# Altium PCB 400390.PcbDoc (part 3 of 5)
Units mm, origin at the board's own origin, x right, y up, seen from the top; angles counter-clockwise.
Board outline 50.8 x 50.4 mm, 4 copper layers (Top Layer, Mid Layer 1, Mid Layer 2, Bottom Layer), stack 1.507 mm thick; 262 components, 210 nets, 1216 pads, 1075 vias.
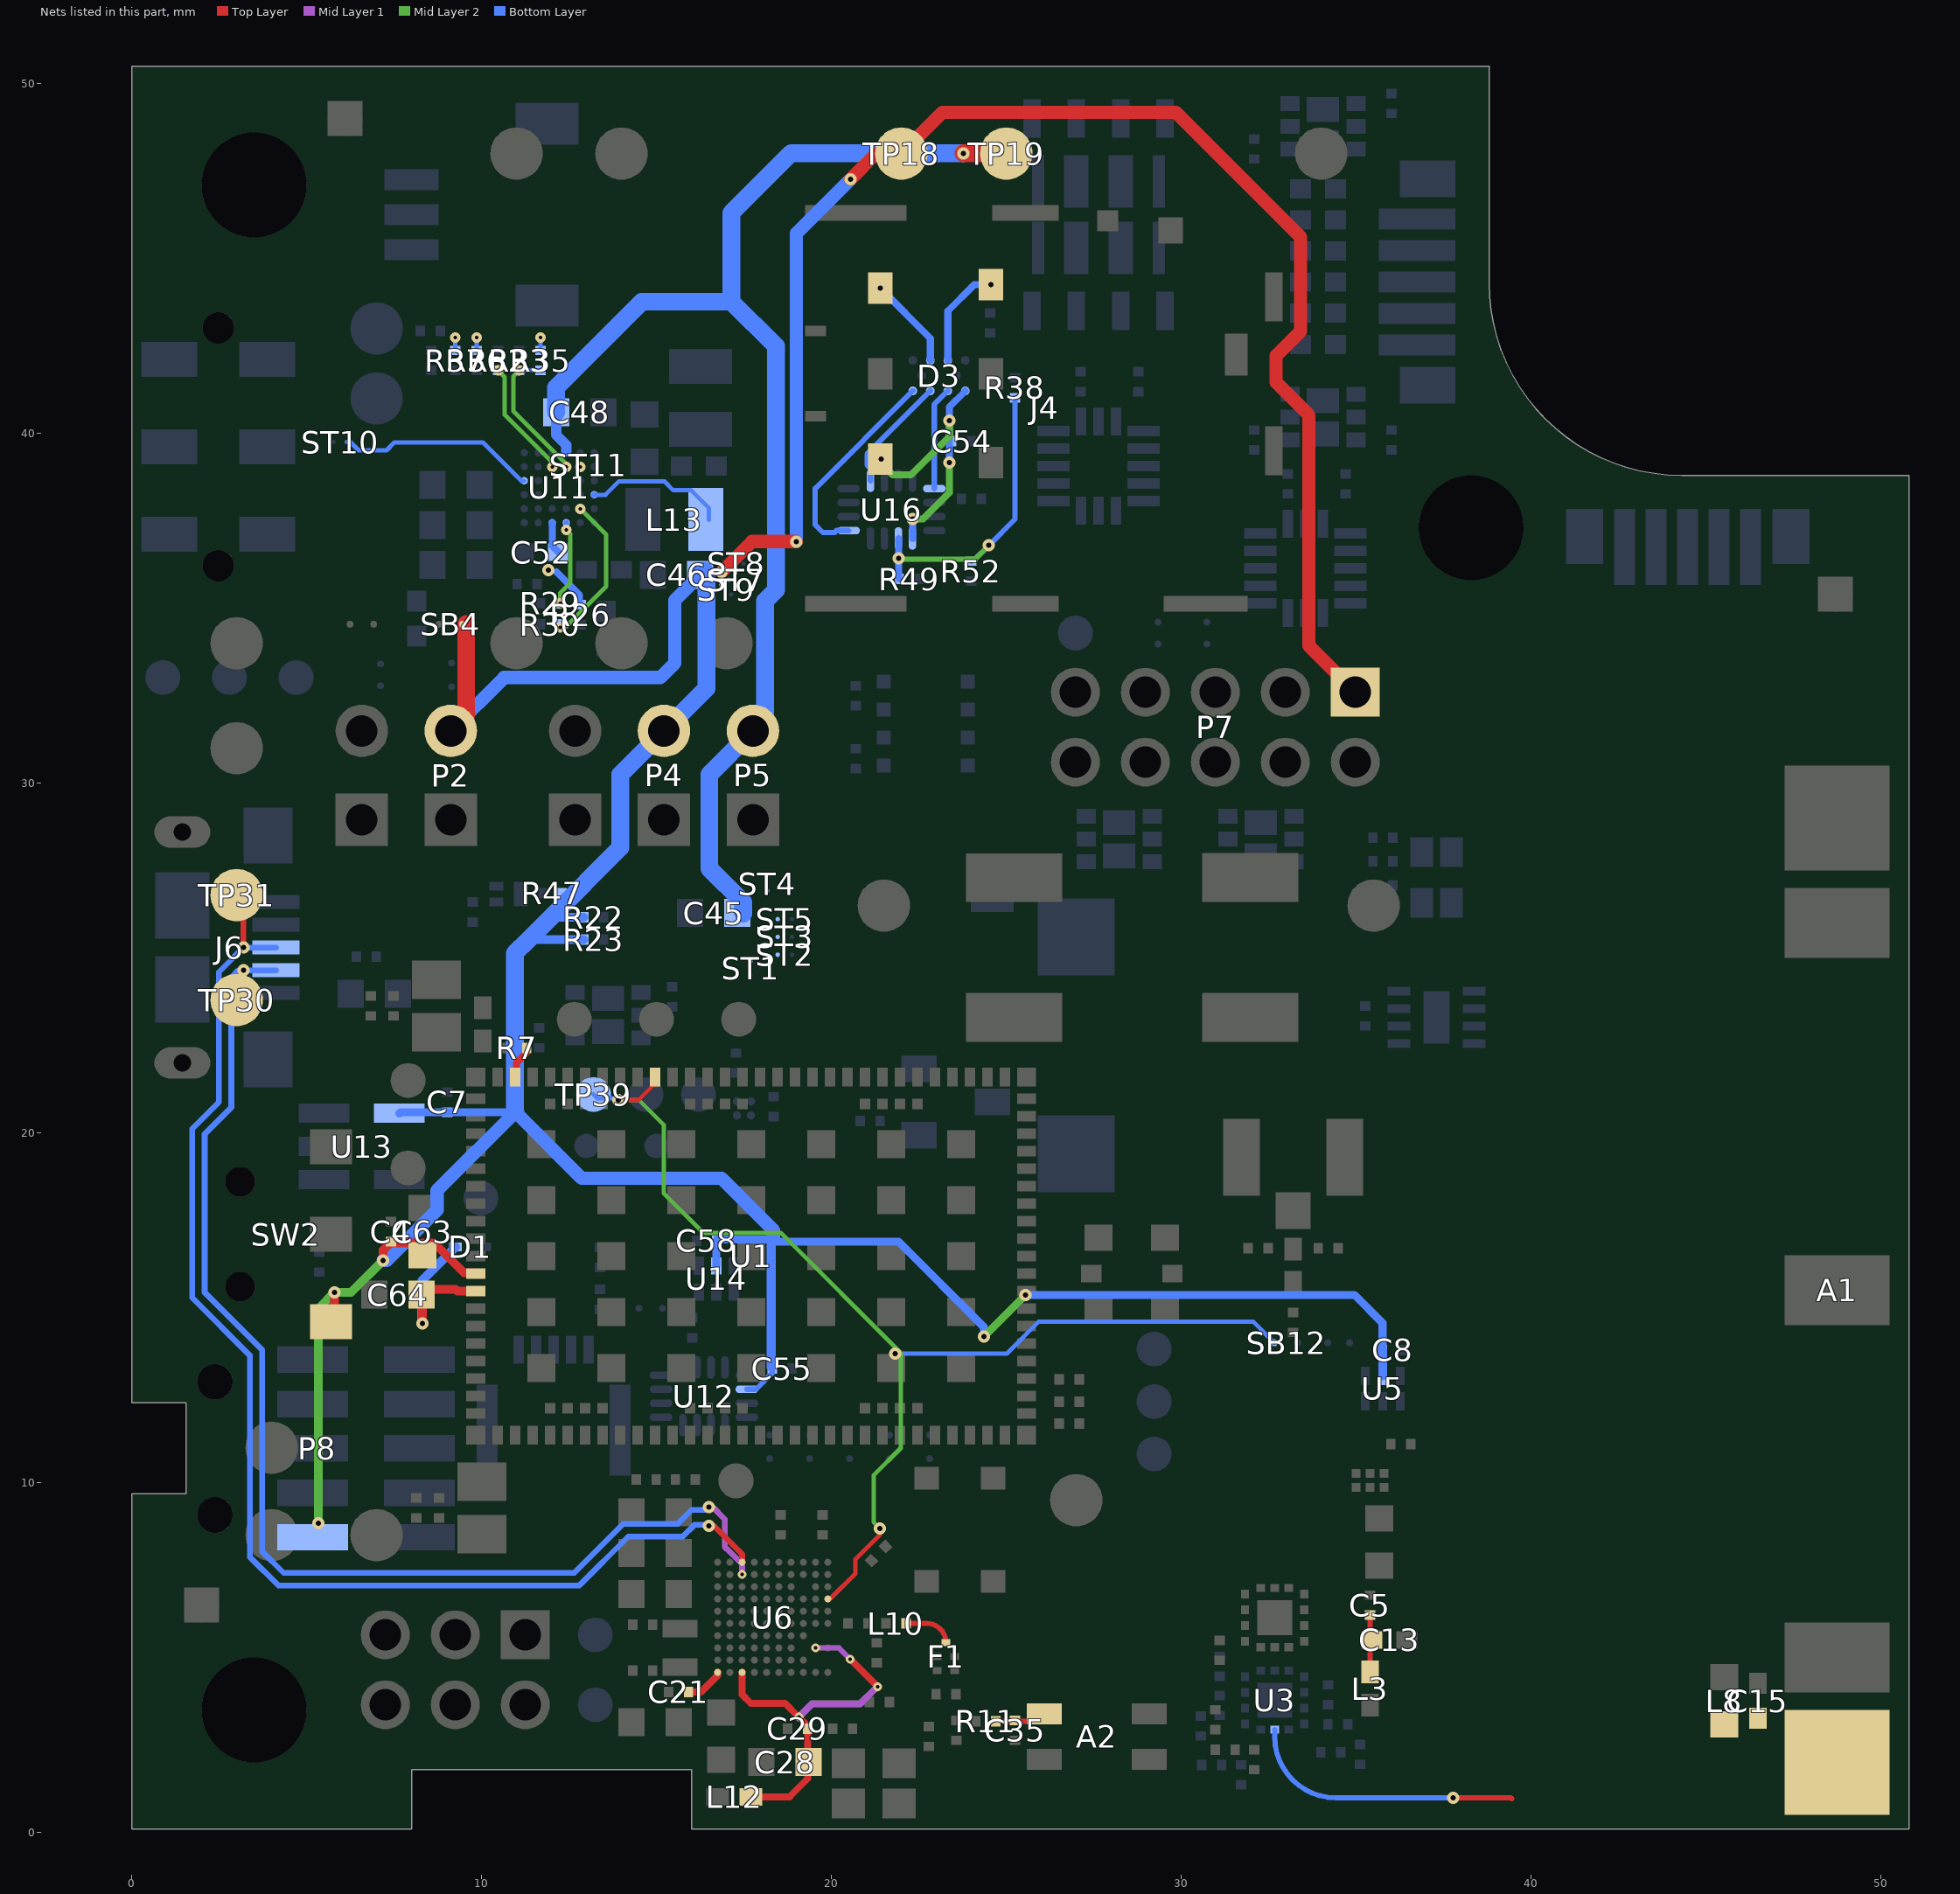
[diagram p4: the nets of this part, all layers, seen from the top]

## Part data (continued)
R13 R14: library part R0201-39R, "Resistor, ±1%, 0.05W", Manufacturer=N.A., Part number IPS=00000001704, Artikkelnr Noca=N.A., Component Class=Resistors, ComponentLink1Description=Datasheet, ComponentLink1URL=N.A., ComponentLink2Description="Supplier link", ComponentLink2URL=N.A., Footprint Doc=0201, HelpURL=N.A., LatestRevisionDate=2014-11-13, Manufacturer Part Number=N.A., Note="Chip Res 1%", Pad Count=2, Part Number=R0201-39R, PartId=100100021, Published=2014-11-13, Supplier 1=N.A., Supplier 2=N.A., Supplier Part Number 1=N.A., Supplier Part Number 2=N.A.
R15 R18: library part R0402-169, "Resistor, ±1%, 0.063W", Manufacturer=N.A., Part number IPS=00000007805, Supplier Part Number 1=541-169LCT-ND, Artikkelnr Noca=N.A., Component Class=Resistors, ComponentLink1Description=Datasheet, ComponentLink1URL=N.A., ComponentLink2Description="Supplier link", ComponentLink2URL=N.A., Footprint Doc=0402, HelpURL=N.A., LatestRevisionDate=2016-09-22, Manufacturer Part Number=N.A., Note="Chip Res 1%", Pad Count=2, Part Number=R0402-169, PartId=100100153, Published=2016-09-22, Supplier 1=Digi-Key, Supplier 2=N.A., Supplier Part Number 2=N.A.
R16 R19: library part R0402-7R15, "Resistor, ±1%, 0.063W", Manufacturer=N.A., Part number IPS=00000007806, Supplier Part Number 1=541-7.15LLCT-ND, Artikkelnr Noca=N.A., Component Class=Resistors, ComponentLink1Description=Datasheet, ComponentLink1URL=N.A., ComponentLink2Description="Supplier link", ComponentLink2URL=N.A., Footprint Doc=0402, HelpURL=N.A., LatestRevisionDate=2016-09-22, Manufacturer Part Number=N.A., Note="Chip Res 1%", Pad Count=2, Part Number=R0402-7R15, PartId=100100123, Published=2016-09-22, Supplier 1=Digi-Key, Supplier 2=N.A., Supplier Part Number 2=N.A.
R17 R20: library part R0402-11R, "Resistor, ±1%, 0.063W", Manufacturer=N.A., Part number IPS=00000007807, Supplier Part Number 1=214-0577, Artikkelnr Noca=N.A., Component Class=Resistors, ComponentLink1Description=Datasheet, ComponentLink1URL=N.A., ComponentLink2Description="Supplier link", ComponentLink2URL=N.A., Footprint Doc=0402, HelpURL=N.A., LatestRevisionDate=2016-11-09, Manufacturer Part Number=N.A., Note="Chip Res 1%", Pad Count=2, Part Number=R0402-11R, PartId=100100127, Published=2016-11-09, Supplier 1=Farnell, Supplier 2=N.A., Supplier Part Number 2=N.A.
R22 R23: library part R0201-4k7, "Resistor, ±1%, 0.05W", Manufacturer=N.A., Part number IPS=00000001706, Artikkelnr Noca=N.A., Component Class=Resistors, ComponentLink1Description=Datasheet, ComponentLink1URL=N.A., ComponentLink2Description="Supplier link", ComponentLink2URL=N.A., Footprint Doc=0201, HelpURL=N.A., LatestRevisionDate=2014-11-13, Manufacturer Part Number=N.A., Note="Chip Res 1%", Pad Count=2, Part Number=R0201-4k7, PartId=100100061, Published=2014-11-13, Supplier 1=N.A., Supplier 2=N.A., Supplier Part Number 1=N.A., Supplier Part Number 2=N.A.
R24: library part R0402-0R1, "Resistor, ±1%, 0.063W", Manufacturer=N.A., Part number IPS=00000001795, Supplier Part Number 1=311-.10PDKR-ND, Artikkelnr Noca=N.A., Component Class=Resistors, ComponentLink1Description=Datasheet, ComponentLink1URL=N.A., ComponentLink2Description="Supplier link", ComponentLink2URL=N.A., Footprint Doc=0402, HelpURL=N.A., LatestRevisionDate=2012-06-22, Manufacturer Part Number=N.A., Note="Chip Res 1%", Pad Count=2, Part Number=R0402-0R1, PartId=100100111, Published=2012-06-22, Supplier 1=Digi-Key, Supplier 2=N.A., Supplier Part Number 2=N.A.
R25 R31: library part R0402-2R2, "Resistor, ±1%, 0.063W", Manufacturer=N.A., Part number IPS=00000001796, Artikkelnr Noca=27049009, Component Class=Resistors, ComponentLink1Description=Datasheet, ComponentLink1URL=N.A., ComponentLink2Description="Supplier link", ComponentLink2URL=N.A., Footprint Doc=0402, HelpURL=N.A., LatestRevisionDate=2012-06-22, Manufacturer Part Number=N.A., Note="Chip Res 1%", Pad Count=2, Part Number=R0402-2R2, PartId=100100116, Published=2012-06-22, Supplier 1=N.A., Supplier 2=N.A., Supplier Part Number 1=N.A., Supplier Part Number 2=N.A.
R26 R29 R33 R51 R52: library part R0201-N.C., "Not mounted", Manufacturer=N.A., Artikkelnr Noca=N.A., Assembly="Not mounted", Component Class=Resistors, ComponentLink1Description=Datasheet, ComponentLink1URL=N.A., ComponentLink2Description="Supplier link", ComponentLink2URL=N.A., Footprint Doc=0201, HelpURL=N.A., LatestRevisionDate=2014-11-13, Manufacturer Part Number=N.A., Note="Chip Res", Pad Count=2, Part Number=R0201-N.C., Part number IPS=N.A., PartId=100100107, Published=2014-11-13, Supplier 1=N.A., Supplier 2=N.A., Supplier Part Number 1=N.A., Supplier Part Number 2=N.A.
R39 R40 R50: library part R0201-100k, "Resistor, ±1%, 0.05W", Manufacturer=N.A., Part number IPS=00000001419, Artikkelnr Noca=N.A., Component Class=Resistors, ComponentLink1Description=Datasheet, ComponentLink1URL=N.A., ComponentLink2Description="Supplier link", ComponentLink2URL=N.A., Footprint Doc=0201, HelpURL=N.A., LatestRevisionDate=2014-11-13, Manufacturer Part Number=N.A., Note="Chip Res 1%", Pad Count=2, Part Number=R0201-100k, PartId=100100080, Published=2014-11-13, Supplier 1=N.A., Supplier 2=N.A., Supplier Part Number 1=N.A., Supplier Part Number 2=N.A.
R48: library part R0201-10M, "Resistor, ±1%, 0.05W", Manufacturer=N.A., Part number IPS=00000001426, Artikkelnr Noca=N.A., Component Class=Resistors, ComponentLink1Description=Datasheet, ComponentLink1URL=N.A., ComponentLink2Description="Supplier link", ComponentLink2URL=N.A., Footprint Doc=0201, HelpURL=N.A., LatestRevisionDate=2014-11-13, Manufacturer Part Number=N.A., Note="Chip Res 1%", Pad Count=2, Part Number=R0201-10M, PartId=100100105, Published=2014-11-13, Supplier 1=N.A., Supplier 2=N.A., Supplier Part Number 1=N.A., Supplier Part Number 2=N.A.
SB1 SB3 SB4 SB7 SB8 SB9 SB10 SB11 SB12 SB14: library part "Solderbridge Shorted", "Shorted Solderbridge", Manufacturer=N.A., Artikkelnr Noca=N.A., Component Class=Connectors, ComponentLink1Description=Datasheet, ComponentLink1URL=N.A., ComponentLink2Description="Supplier link", ComponentLink2URL=N.A., Footprint Doc=Solderbridge_Shorted, HelpURL=N.A., LatestRevisionDate=2012-08-07, Manufacturer Part Number=N.A., Note=N.A., Pad Count=2, Part Number="Solderbridge Shorted", Part number IPS=N.A., PartId=100500459, Published=2012-08-07, Supplier 1=N.A., Supplier 2=N.A., Supplier Part Number 1=N.A., Supplier Part Number 2=N.A.
SB2 SB5 SB6 SB13: Manufacturer=N.A., Artikkelnr Noca=N.A., Component Class=Connectors, ComponentLink1Description=Datasheet, ComponentLink1URL=N.A., ComponentLink2Description="Supplier link", ComponentLink2URL=N.A., Footprint Doc=Solderbridge, HelpURL=N.A., LatestRevisionDate=2009-12-14, Manufacturer Part Number=N.A., Note=N.A., Pad Count=2, Part Number=Solderbridge, Part number IPS=N.A., PartId=100500458, Published=2009-12-14, Supplier 1=N.A., Supplier 2=N.A., Supplier Part Number 1=N.A., Supplier Part Number 2=N.A.
ST1 ST2 ST3 ST4 ST5 ST7 ST8 ST9 ST10 ST11: library part "2 pin starpoint", "Starpoint", Artikkelnr Noca=N.A., Component Class=Connectors, ComponentLink1Description=Datasheet, ComponentLink1URL=N.A., ComponentLink2Description="Supplier link", ComponentLink2URL=N.A., Footprint Doc=N.A., HelpURL=N.A., LatestRevisionDate=2017-08-31, Manufacturer=N.A., Manufacturer Part Number=N.A., Note=N.A., Pad Count=2, Part Number="2 pin starpoint", Part number IPS=N.A., PartId=100500603, Published=2017-08-31, Supplier 1=N.A., Supplier 2=N.A., Supplier Part Number 1=N.A., Supplier Part Number 2=N.A.
SW1: library part Switch-Slide-RA-J-Lead-DPDT-8.5x3.5mm_Copal, "SMD slide Switch (ON-ON)", Manufacturer="Copal Electronics Inc", Manufacturer Part Number=CL-SB-22A-11T, Part number IPS=00000007811, Supplier Part Number 1=563-1340-1-ND, Artikkelnr Noca=N.A., Component Class=Switches, ComponentLink1Description=Datasheet, ComponentLink1URL=N.A., ComponentLink2Description="Supplier link", ComponentLink2URL=N.A., Footprint Doc=Switch-Slide-RA-J-Lead-DPDT-8.5x3.5mm, HelpURL=http://www.nidec-copal-electronics.com/e/catalog/switch/cl-sb.pdf, LatestRevisionDate=2017-02-01, Note=N.A., Pad Count=6, Part Number=Switch-Slide-RA-J-Lead-DPDT-8.5x3.5mm_Copal, PartId=101500038, Published=2017-02-01, Supplier 1=Digi-Key, Supplier 2=Avnet, Supplier Part Number 2=CL-SB-22A-11T
SW2: "Miniature slide switch, SPDT, Right-Angle, ON-ON, 12V, 100mA", Manufacturer=C&K, Part number IPS=00000002488, Supplier Part Number 1=401-2012-1-ND, Artikkelnr Noca=N.A., Component Class=Switches, ComponentLink1Description=Datasheet, ComponentLink1URL=https://www.ckswitches.com/media/1431/ayz.pdf, ComponentLink2Description="Supplier link", ComponentLink2URL=N.A., Footprint Doc=AYZ0102AGRLC, HelpURL=https://www.ckswitches.com/media/1431/ayz.pdf, LatestRevisionDate=2019-05-08, Manufacturer Part Number=AYZ0102AGRLC, Note=N.A., Pad Count=3, Part Number=AYZ0102AGRLC, PartId=101500120, Published=2019-05-08, Supplier 1=Digi-Key, Supplier 2=N.A., Supplier Part Number 2=N.A.
SW3: library part Switch-PB-6.2x6.3mm-SMD, "Tactile Switch, SPNO, SMD, 160gf, 6.2x6.3x2.5mm", Manufacturer=Dailywell, Manufacturer Part Number=TS604VM1-025BR-R, Part number IPS=00000007812, Artikkelnr Noca=50019106, Component Class=Switches, ComponentLink1Description=Datasheet, ComponentLink1URL=N.A., ComponentLink2Description="Supplier link", ComponentLink2URL=N.A., Footprint Doc=Switch-PB-6.2x6.3mm-SMD, HelpURL=\\hizz\pro\app9717\Datasheet\switches\Dailywell\TS604VM1-025BR-R.pdf, LatestRevisionDate=2016-04-21, Note=N.A., Pad Count=4, Part Number=Switch-PB-6.2x6.3mm-SMD, PartId=101500001, Published=2010-02-01, Supplier 1=Cabcon, Supplier 2=Mouser, Supplier Part Number 1=TS604VM1-025BR-R, Supplier Part Number 2=688-SKHUALE010
SW4: library part "KMT021 NGJ LHS", "Nano-Miniature Top Actuated Tact Switch with extended life 3.0x2.6mm", Manufacturer=C&K, Part number IPS=00000005416, Supplier Part Number 1=CKN10289CT-ND, Artikkelnr Noca=N.A., Component Class=Switches, ComponentLink1Description=Datasheet, ComponentLink1URL=N.A., ComponentLink2Description="Supplier link", ComponentLink2URL=N.A., Footprint Doc=SW_TACTILE_2.6x3.0MM_4-LEAD, HelpURL=http://media.digikey.com/pdf/Data%20Sheets/C&K/KMT_0xx_NGJ_LHS_Drawing.pdf, LatestRevisionDate=2013-08-12, Manufacturer Part Number="KMT021 NGJ LHS", Note=N.A., Pad Count=4, Part Number="KMT021 NGJ LHS", PartId=101500039, Published=2013-08-12, Supplier 1=Digi-Key, Supplier 2=Farnell, Supplier Part Number 2=190-8260
TP1 TP2 TP3 TP4 TP7 TP8 TP22 TP23 TP24 TP25 TP26 TP34 TP35 TP36 TP37 TP38 TP39 TP40 TP41: library part TP_SMD_Ø1.0MM, "1.0mm circular SMD testpad", Manufacturer="Nordic Semiconductor", Manufacturer Part Number=N.A., Artikkelnr Noca=N.A., Component Class=Connectors, ComponentLink1Description=Datasheet, ComponentLink1URL=N.A., ComponentLink2Description="Supplier link", ComponentLink2URL=N.A., Footprint Doc=TP_SMD_Ø1.0mm, HelpURL=N.A., LatestRevisionDate=2013-06-11, Note=N.A., Pad Count=1, Part Number=TP_SMD_Ø1.0MM, Part number IPS=N.A., PartId=100500475, Published=2013-06-11, Supplier 1=N.A., Supplier 2=N.A., Supplier Part Number 1=N.A., Supplier Part Number 2=N.A.
TP5 TP6: library part TP_SMD_Ø0.7MM, "0.7mm circular SMD testpad", Manufacturer="Nordic Semiconductor", Manufacturer Part Number=N.A., Artikkelnr Noca=N.A., Component Class=Connectors, ComponentLink1Description=Datasheet, ComponentLink1URL=N.A., ComponentLink2Description="Supplier link", ComponentLink2URL=N.A., Footprint Doc=TP_SMD_Ø0.7mm, HelpURL=N.A., LatestRevisionDate=2017-12-14, Note=N.A., Pad Count=1, Part Number=TP_SMD_Ø0.7MM, Part number IPS=N.A., PartId=100500474, Published=2017-12-14, Supplier 1=N.A., Supplier 2=N.A., Supplier Part Number 1=N.A., Supplier Part Number 2=N.A.
TP9 TP10 TP11 TP12 TP13 TP14 TP15 TP16 TP17 TP18 TP19 TP20 TP21 TP27 TP28 TP29 TP30 TP31 TP32 TP33: library part TP_SMD_Ø1.5MM, "1.5mm circular SMD testpad", Manufacturer="Nordic Semiconductor", Manufacturer Part Number=N.A., Artikkelnr Noca=N.A., Component Class=Connectors, ComponentLink1Description=Datasheet, ComponentLink1URL=N.A., ComponentLink2Description="Supplier link", ComponentLink2URL=N.A., Footprint Doc=TP_SMD_Ø1.5mm, HelpURL=N.A., LatestRevisionDate=2016-06-02, Note=N.A., Pad Count=1, Part Number=TP_SMD_Ø1.5MM, Part number IPS=N.A., PartId=100500477, Published=2016-06-02, Supplier 1=N.A., Supplier 2=N.A., Supplier Part Number 1=N.A., Supplier Part Number 2=N.A.
U1: "Low power System-in-Package with integrated LTE-M/NB-IoT modem and GPS", Manufacturer="Nordic Semiconductor", Part number IPS=80000002329, Artikkelnr Noca=N.A., Component Class=nRF_Devices, ComponentLink1Description=Datasheet, ComponentLink1URL=N.A., ComponentLink2Description="Supplier link", ComponentLink2URL=N.A., Footprint Doc=LGA-161, HelpURL=N.A., LatestRevisionDate=2020-08-13, Manufacturer Part Number=nRF9160-SICAB1A, Note=N.A., Pad Count=161, Part Number=nRF9160-SICAB1A, PartId=102000165, Published=2020-08-13, Supplier 1="Nordic Semiconductor", Supplier 2=N.A., Supplier Part Number 1=nRF9160-SICAB1A, Supplier Part Number 2=N.A.
U2 U3: "SP8T Switch For 3G/4G Applications", Manufacturer=Qorvo, Part number IPS=80000001821, Supplier Part Number 1=N.A., Artikkelnr Noca=N.A., Component Class=Misc_ICs, ComponentLink1Description=Datasheet, ComponentLink1URL="\\hizz\pro\app9717\Datasheet\integated circuits\qorvo\QM12038 Datasheet.pdf", ComponentLink2Description="Supplier link", ComponentLink2URL=N.A., Footprint Doc=UFQFN-14, HelpURL=N.A., LatestRevisionDate=2018-09-18, Manufacturer Part Number=QM12038, Note=N.A., Pad Count=14, Part Number=QM12038, PartId=101900557, Published=2018-09-18, Supplier 1=N.A., Supplier 2=N.A., Supplier Part Number 2=N.A.
U4: library part BGA524N6E6327XTSA1, "GPS/GNSS Low-Noise Amplifier, 19.6dB Gain, 0.55dB Noise Figure, 1.5V to 3.3V Supply Range", Manufacturer="Infineon Technologies", Part number IPS=00000004011, Supplier Part Number 1=BGA524N6E6327XTSA1CT-ND, Artikkelnr Noca=N.A., Component Class=Misc_ICs, ComponentLink1Description=Datasheet, ComponentLink1URL=https://www.infineon.com/dgdl/Infineon-BGA524N6-DS-v03_00-en.pdf?fileId=db3a304344e406b50144e44dfad302b9, ComponentLink2Description="Supplier link", ComponentLink2URL=N.A., Footprint Doc=XFDFN-6, HelpURL=https://www.infineon.com/cms/en/product/rf-wireless-control/low-noise-amplifier-lna-ics/gps-glonass-compass-lna/bga524n6/, LatestRevisionDate=2019-10-25, Manufacturer Part Number=BGA524N6E6327XTSA1, Note=N.A., Pad Count=6, Part Number=BGA524N6E6327XTSA1, PartId=101900596, Published=2019-10-25, Supplier 1=Digi-Key, Supplier 2=Mouser, Supplier Part Number 2=726-A524N6E6327XTSA1
U5: "Single 3-input AND gate", Manufacturer="ON Semiconductor", Part number IPS=00000001709, Supplier Part Number 1=NC7SV11L6XCT-ND, Artikkelnr Noca=N.A., Component Class=Misc_ICs, ComponentLink1Description=Datasheet, ComponentLink1URL=https://www.fairchildsemi.com/datasheets/NC/NC7SV11.pdf, ComponentLink2Description="Supplier link", ComponentLink2URL=N.A., Footprint Doc=UFDFN-6, HelpURL=https://www.fairchildsemi.com/datasheets/NC/NC7SV11.pdf, LatestRevisionDate=2018-09-27, Manufacturer Part Number=NC7SV11L6X, Note="Single 3-input AND gate", Pad Count=6, Part Number=NC7SV11L6X, PartId=101900559, Published=2018-09-27, Supplier 1=Digi-Key, Supplier 2=Mouser, Supplier Part Number 2=512-NC7SV11L6X
U6: library part nRF52840-CKAAD0, "Multi-protocol Bluetooth Low Energy, IEEE 802.15.4, ANT and 2.4GHz proprietary system-on-chip", Manufacturer="Nordic Semiconductor", Part number IPS=80000001822, Artikkelnr Noca=N.A., Component Class=nRF_Devices, ComponentLink1Description=Datasheet, ComponentLink1URL=N.A., ComponentLink2Description="Supplier link", ComponentLink2URL=N.A., Footprint Doc=WLCSP-94, HelpURL=N.A., LatestRevisionDate=2018-12-17, Manufacturer Part Number=nRF52840-CKAAD0, Note=N.A., Pad Count=94, Part Number=nRF52840-CKAAD0, PartId=102000136, Published=2018-12-17, Supplier 1="Nordic Semiconductor", Supplier 2=N.A., Supplier Part Number 1=nRF52840-CKAAD0, Supplier Part Number 2=N.A.
U7: "Micropower, 3-Axis, ±200g digital output acelerometer", Manufacturer="Analog Devices", Part number IPS=00000001798, Supplier Part Number 1=ADXL372BCCZ-RL7CT-ND, Artikkelnr Noca=N.A., Component Class=Misc_ICs, ComponentLink1Description=Datasheet, ComponentLink1URL=http://www.analog.com/media/en/technical-documentation/data-sheets/ADXL372.pdf, ComponentLink2Description="Supplier link", ComponentLink2URL=http://www.analog.com/en/products/adxl372.html, Footprint Doc=LGA-16, HelpURL=http://www.analog.com/en/products/adxl372.html, LatestRevisionDate=2018-08-24, Manufacturer Part Number=ADXL372, Note=N.A., Pad Count=16, Part Number=ADXL372, PartId=101900553, Published=2018-08-24, Supplier 1=Digi-Key, Supplier 2=N.A., Supplier Part Number 2=N.A.
U8: "Micropower, 3-Axis, ±2 g/±4 g/±8 g Digital Output MEMS Accelerometer", Manufacturer="Analog Devices", Part number IPS=00000001799, Supplier Part Number 1=ADXL362BCCZ-RL7CT-ND, Artikkelnr Noca=N.A., Component Class=Misc_ICs, ComponentLink1Description=Datasheet, ComponentLink1URL=http://www.analog.com/media/en/technical-documentation/data-sheets/ADXL362.pdf, ComponentLink2Description="Supplier link", ComponentLink2URL=http://www.analog.com/en/products/adxl362.html, Footprint Doc=LGA-16, HelpURL=https://www.analog.com/media/en/technical-documentation/data-sheets/ADXL362.pdf, LatestRevisionDate=2019-01-11, Manufacturer Part Number=ADXL362, Note=N.A., Pad Count=16, Part Number=ADXL362, PartId=101900573, Published=2019-01-11, Supplier 1=Digi-Key, Supplier 2=Mouser, Supplier Part Number 2=584-ADXL362BCCZ-R7
U9: "Low power gas, pressure, temperature & humidity sensor", Manufacturer=Bosch, Part number IPS=00000001800, Supplier Part Number 1=828-1077-1-ND, Artikkelnr Noca=N.A., Component Class=Misc_ICs, ComponentLink1Description=Datasheet, ComponentLink1URL=https://ae-bst.resource.bosch.com/media/_tech/media/datasheets/BST-BME680-DS001-00.pdf, ComponentLink2Description="Supplier link", ComponentLink2URL=N.A., Footprint Doc=LGA-8, HelpURL=N.A., LatestRevisionDate=2018-05-24, Manufacturer Part Number=BME680, Note=N.A., Pad Count=8, Part Number=BME680, PartId=101900532, Published=2018-05-24, Supplier 1=Digi-Key, Supplier 2=N.A., Supplier Part Number 2=N.A.
U10: "Digital 16bit Serial Output Type Color Sensor IC", Manufacturer="Rohm Semiconductor", Part number IPS=00000001801, Supplier Part Number 1=BH1749NUC-E2CT-ND, Artikkelnr Noca=N.A., Component Class=Misc_ICs, ComponentLink1Description=Datasheet, ComponentLink1URL=N.A., ComponentLink2Description="Supplier link", ComponentLink2URL=N.A., Footprint Doc=WSON-8, HelpURL=https://www.rohm.com/datasheet/BH1749NUC/bh1749nuc-e, LatestRevisionDate=2019-01-11, Manufacturer Part Number=BH1749NUC, Note=N.A., Pad Count=8, Part Number=BH1749NUC, PartId=101900572, Published=2019-01-11, Supplier 1=Digi-Key, Supplier 2=Mouser, Supplier Part Number 2=755-BH1749NUC-E2
U11: "Advanced Battery Management PMIC With Ultralow Iq Buck and Buck-Boost", Manufacturer="Analog Devices", Part number IPS=80000001823, Supplier Part Number 1=N.A., Artikkelnr Noca=N.A., Component Class=Misc_ICs, ComponentLink1Description=Datasheet, ComponentLink1URL="\\hizz\pro\app9717\Datasheet\integated circuits\analog\ADP5360 PRC3 Datasheet_022017.pdf", ComponentLink2Description="Supplier link", ComponentLink2URL=N.A., Footprint Doc=WLCSP-32, HelpURL=N.A., LatestRevisionDate=2018-09-18, Manufacturer Part Number=ADP5360ACBZ, Note=N.A., Pad Count=32, Part Number=ADP5360ACBZ, PartId=101900554, Published=2018-09-18, Supplier 1=N.A., Supplier 2=N.A., Supplier Part Number 2=N.A.
U12: "Data / Audio Low-Voltage Dual DPDT Analog Switch", Manufacturer="ON Semiconductor", Part number IPS=00000009986, Supplier Part Number 1=FSA2466UMXCT-ND, Artikkelnr Noca=15070069, Component Class=Misc_ICs, ComponentLink1Description=Datasheet, ComponentLink1URL=N.A., ComponentLink2Description="Supplier link", ComponentLink2URL=N.A., Footprint Doc=UFQFN-16, HelpURL=https://www.onsemi.com/pub/Collateral/FSA2466-D.PDF, LatestRevisionDate=2019-05-15, Manufacturer Part Number=FSA2466UMX, Note=N.A., Pad Count=16, Part Number=FSA2466UMX, PartId=101900422, Published=2016-05-18, Supplier 1=Digi-Key, Supplier 2=Mouser, Supplier Part Number 2=512-FSA2466UMX
U13: library part 24CW160T-I/OT, "16 Kbit I2C Serial EEPROM with Software Write Protection, 1.6-5.5 V Supply", Manufacturer="Microchip Technology", Part number IPS=00000004049, Supplier Part Number 1=24CW160T-I/OTCT-ND, Artikkelnr Noca=N.A., Component Class=Misc_ICs, ComponentLink1Description=Datasheet, ComponentLink1URL=http://ww1.microchip.com/downloads/en/DeviceDoc/24CW16X-24CW32X-24CW64X-24CW128X-Data-Sheet-20005772B.pdf, ComponentLink2Description="Supplier link", ComponentLink2URL=https://www.digikey.com/product-detail/en/microchip-technology/24CW160T-I-OT/24CW160T-I-OTCT-ND/8594982, Footprint Doc=TSOT23-5, HelpURL=https://www.microchip.com/wwwproducts/en/24CW160, LatestRevisionDate=2020-01-17, Manufacturer Part Number=24CW160T-I/OT, Note=N.A., Pad Count=5, Part Number=24CW160T-I/OT, PartId=101900604, Published=2020-01-17, Supplier 1=Digi-Key, Supplier 2=Mouser, Supplier Part Number 2=579-24CW160T-I/OT
U14: "Low-Voltage, SPDT Analog Switch, 1.65 V to 5.5 V", Manufacturer="ON Semiconductor", Part number IPS=00000003748, Supplier Part Number 1=FSA4157L6XCT-ND, Artikkelnr Noca=N.A., Component Class=Misc_ICs, ComponentLink1Description=Datasheet, ComponentLink1URL=https://www.onsemi.com/pub/Collateral/FSA4157-D.pdf, ComponentLink2Description="Supplier link", ComponentLink2URL=https://www.digikey.com/product-detail/en/on-semiconductor/FSA4157L6X/FSA4157L6XCT-ND/821004, Footprint Doc=UFDFN-6, HelpURL=https://www.onsemi.com/pub/Collateral/FSA4157-D.pdf, LatestRevisionDate=2020-04-29, Manufacturer Part Number=FSA4157L6X, Note=N.A., Pad Count=6, Part Number=FSA4157L6X, PartId=101900593, Published=2019-10-22, Supplier 1=Digi-Key, Supplier 2=Mouser, Supplier Part Number 2=512-FSA4157L6X
U15: library part M2M_UICC, "M2M UICC SIM Card", Manufacturer=N.A., Artikkelnr Noca=N.A., Assembly="Not mounted", Component Class=Misc_ICs, ComponentLink1Description=Datasheet, ComponentLink1URL=N.A., ComponentLink2Description="Supplier link", ComponentLink2URL=N.A., Footprint Doc=SON-8, HelpURL=N.A., LatestRevisionDate=2019-10-22, Manufacturer Part Number=N.A., Note=N.A., Pad Count=8, Part Number=M2M_UICC, Part number IPS=N.A., PartId=101900595, Published=2019-10-22, Supplier 1=N.A., Supplier 2=N.A., Supplier Part Number 1=N.A., Supplier Part Number 2=N.A.
U16: library part NX3DV2567GU, "Low-ohmic four-pole double-throw analog switch", Manufacturer="NXP Semiconductors", Part number IPS=00000007816, Supplier Part Number 1=568-5206-1-ND, Artikkelnr Noca=15079317, Component Class=Misc_ICs, ComponentLink1Description=Datasheet, ComponentLink1URL=N.A., ComponentLink2Description="Supplier link", ComponentLink2URL=N.A., Footprint Doc=XQFN-16, HelpURL=http://www.nxp.com/documents/data_sheet/NX3DV2567.pdf, LatestRevisionDate=2015-02-17, Manufacturer Part Number=NX3DV2567GU, Note=N.A., Pad Count=16, Part Number=NX3DV2567GU, PartId=101900290, Published=2015-02-17, Supplier 1=Digi-Key, Supplier 2=Mouser, Supplier Part Number 2=771-NX3DV2567GU115
U17: "1.0 A Load Switch IC with Slew Rate Control Driver in Ultra Small Package", Manufacturer=Toshiba, Manufacturer Part Number=TCK106AG,LF, Part number IPS=00000004390, Supplier Part Number 1=TCK106AGLFTR-ND, Artikkelnr Noca=N.A., Component Class=Misc_ICs, ComponentLink1Description=Datasheet, ComponentLink1URL=https://toshiba.semicon-storage.com/info/docget.jsp?did=30131&prodName=TCK106AG, ComponentLink2Description="Supplier link", ComponentLink2URL=N.A., Footprint Doc=WLCSP-4, HelpURL=N.A., LatestRevisionDate=2019-03-01, Note=N.A., Pad Count=4, Part Number=TCK106AG, PartId=101900575, Published=2019-02-17, Supplier 1=Digi-Key, Supplier 2=Mouser, Supplier Part Number 2=757-TCK106AGLF
X1: library part XTAL_SMD2016_32MHz_8pF_Golledge, "XTAL SMD 2016, 32MHz, Cl=8pF, Tol: ±10ppm, Stab: ±15ppm", Manufacturer=Golledge, Manufacturer Part Number=MP06003, Part number IPS=00000001431, Supplier Part Number 1=N.A., Artikkelnr Noca=22010050, Component Class=Oscillators, ComponentLink1Description=Datasheet, ComponentLink1URL=N.A., ComponentLink2Description="Supplier link", ComponentLink2URL=N.A., Footprint Doc=XTAL_2016, HelpURL=\\hizz\pro\app9717\Datasheet\crystals\Golledge\mp06003.pdf, LatestRevisionDate=2016-11-02, Note="XTAL SMD 32.000MHz", Pad Count=4, Part Number=XTAL_SMD2016_32MHz_8pF_Golledge, PartId=101600041, Published=2016-11-02, Supplier 1="Link Nordic", Supplier 2=N.A., Supplier Part Number 2=N.A.
X2: library part XTAL_SMD1610_32.768kHz_9pF_Seiko, "XTAL SMD 1610, 32.768kHz, 9pF, ±20ppm", Manufacturer="Seiko Instruments", Manufacturer Part Number=SC16S-9.0PF20PPM, Part number IPS=00000001802, Supplier Part Number 1=N.A., Artikkelnr Noca=N.A., Component Class=Oscillators, ComponentLink1Description=Datasheet, ComponentLink1URL=N.A., ComponentLink2Description="Supplier link", ComponentLink2URL=N.A., Footprint Doc=XTAL_1610, HelpURL=http://www.sii.co.jp/en/quartz/files/2014/07/SC-16S_Leaflet_r.pdf, LatestRevisionDate=2015-10-15, Note="XTAL SMD 32.768kHz", Pad Count=2, Part Number=XTAL_SMD1610_32.768kHz_9pF_Seiko, PartId=101600010, Published=2015-10-15, Supplier 1=N.A., Supplier 2=N.A., Supplier Part Number 2=N.A.

## Free pads (board coordinates)
  round 0.25 on Mech16: 1(15.829,3.556) 1(17.097,4.926) 1(17.097,5.276) 1(17.097,5.626) 1(17.097,5.976) 1(17.097,6.676) 1(17.097,7.376) 1(17.447,7.026) 1(17.447,4.926) 1(17.447,7.376) 1(17.797,4.926) 1(17.797,7.376) 1(18.147,7.376) 1(18.497,7.376) 1(18.847,4.576) 1(18.847,7.376) 1(19.197,4.926) 1(19.197,7.376) 1(19.547,5.272) 1(19.547,5.976) 1(19.547,6.326) 1(19.547,6.676) 1(19.547,7.026) 1(19.547,7.376) ""(21.006,7.671) ""(21.742,8.255)
  round 0.35 on Mech16: 1(17.655,6.023) 1(18.491,5.969) 2(19.544,40.488) 2(19.544,42.928) 2(21.394,41.708) 2(21.394,44.148) 2(21.42,39.268) 2(24.564,39.168) 2(24.564,44.248) 2(31.569,42.258) 2(38.426,23.05) 2(38.426,23.55) 2(38.426,24.05) ""(6.831,23.344) ""(6.931,15.377) ""(7.481,23.344) ""(8.131,8.992) ""(8.306,17.852) ""(8.706,22.877) ""(8.781,8.99) ""(9.509,37.379) ""(9.509,37.379) ""(9.836,11.357) ""(9.836,13.477) ""(9.836,14.977) ""(9.836,16.477) ""(9.836,17.477) ""(9.836,17.977) ""(9.836,18.477) ""(9.836,18.977) ""(9.836,19.477) ""(9.836,21.597) ""(10.006,8.527) ""(11.706,14.877) ""(11.706,16.477) ""(11.706,18.077) ""(11.706,19.677) ""(11.706,13.277) ""(11.916,36.084) ""(12.456,21.597) ""(12.956,11.357) ""(13.689,40.375) ""(13.689,40.832) ""(13.706,14.877) ""(13.706,16.477) ""(13.706,18.077) ""(13.706,19.677) ""(13.706,13.277) ""(14.376,40.513) ""(14.456,21.597) ""(14.553,36.182) ""(14.554,35.75) ""(14.653,12.271) ""(14.884,40.513) ""(14.956,11.357) ""(15.037,35.75) ""(15.037,36.182) ""(15.706,19.677) ""(15.706,13.277) ""(15.706,14.877) ""(15.706,16.477) ""(15.706,18.077) ""(16.456,21.597) ""(16.764,39.065) ""(16.956,11.357) ""(17.456,11.357) ""(17.706,18.077) ""(17.706,13.429) ""(17.706,14.877) ""(17.706,16.477) ""(17.706,19.677) ""(17.907,12.268) ""(18.956,21.597) ""(19.706,13.429) ""(19.706,14.877) ""(19.706,16.477) ""(19.706,18.077) ""(19.706,19.677) ""(20.456,21.597) ""(20.956,21.597) ""(21.456,21.597) ""(21.706,14.877) ""(21.706,13.379) ""(21.706,16.477) ""(21.706,18.077) ""(21.706,19.677) ""(21.956,21.597) ""(22.456,21.597) ""(22.723,10.129) ""(22.956,11.357) ""(22.956,21.597) ""(23.456,21.597) ""(23.706,13.277) ""(23.706,14.877) ""(23.706,16.477) ""(23.706,18.077) ""(23.706,19.677) ""(23.956,21.597) ""(24.456,11.357) ""(24.456,21.597) ""(25.576,11.357) ""(25.576,13.477) ""(25.576,15.477) ""(25.576,16.477) ""(25.576,16.977) ""(25.576,17.977) ""(25.576,18.477) ""(25.576,19.477) ""(25.576,19.977) ""(25.576,21.597) ""(31.096,4.462) ""(31.101,5.469) ""(31.608,3.556) ""(32.112,2.664) ""(33.734,6.819) ""(33.734,3.556)
  round 0.3 on Mech16: ""(9.249,41.799) ""(9.858,41.799) ""(10.468,41.799) ""(11.078,41.799) ""(11.621,37.846) ""(11.621,38.246) ""(11.621,38.646) ""(11.621,39.046) ""(12.021,37.846) ""(12.021,39.046) ""(12.252,34.458) ""(12.252,35.144) ""(12.421,37.243) ""(12.421,37.846) ""(12.421,39.046) ""(12.821,37.846) ""(12.821,38.246) ""(12.821,38.646) ""(12.821,39.046) ""(12.957,34.529)

## Via types
v1: diameter 0.35, hole 0.15, Top Layer to Bottom Layer, tented both sides, 535 vias
v2: diameter 0.35, hole 0.15, Top Layer to Mid Layer 1, tented both sides, 229 vias
v3: diameter 0.35, hole 0.15, Mid Layer 2 to Bottom Layer, tented both sides, 195 vias
v4: diameter 0.35, hole 0.15, Top Layer to Mid Layer 1, tented top, 48 vias
v5: diameter 0.25, hole 0.1, Top Layer to Mid Layer 1, tented both sides, 35 vias
v6: diameter 0.3, hole 0.1, Mid Layer 2 to Bottom Layer, tented both sides, 26 vias
v7: diameter 0.3, hole 0.1, Top Layer to Mid Layer 1, tented both sides, 3 vias
v8: diameter 0.25, hole 0.1, Mid Layer 2 to Bottom Layer, tented both sides, 2 vias
v9: diameter 0.61, hole 0.305, Top Layer to Bottom Layer, tented both sides, 2 vias

## Nets (pads, with @x,y where several pads share a name; then routed paths per layer and width w, separated by ;. In a path a pad name is that pad's centre, name@x,y a point inside that pad or via, vN(x,y) a via of type N, cw(c..) or ccw(c..) an arc to the next point about the centre after c; other vN are vias at no path point)
1V8: C4.1 C7.1 C8.2 C46.2 C55.1 C58.1 C63.1 L13.2 P2.2 P4.2 P7.1 P8.1 R22.1 R23.1 R47.1 SB4.2 ST7.1 ST8.1 ST9.1 SW2.3 TP18.1 U1.12 U5.5 U11.D1 U12.14 U13.4 U14.2 | length 139.7
  Top Layer w0.25: v1(7.188,16.358) 7.188,16.649 C4.1@7.391,16.852 ; C4.1@7.366,16.852 C4.1@7.391,16.852 ; C4.1@7.406,16.892 7.401,16.892 7.391,16.882 C4.1@7.391,16.852 ; U1.12@9.836,15.977 9.811,16.002 9.497,16.002 8.647,16.852 C4.1@7.391,16.852
  Top Layer w0.254: SW2.3@5.799,14.699 v1(5.799,15.443)
  Top Layer w0.381: v1(16.866,36.043) 17.729,36.906 v1(18.999,36.906) ; v1(20.549,47.269) 21.279,48 TP18.1@22,48 23.174,49.174 29.845,49.174 33.409,45.61 33.409,42.92 32.707,42.218 32.707,41.461 33.645,40.523 33.645,33.93 P7.1@34.975,32.6
  Top Layer w0.508: P2.2@9.119,31.496 9.56,31.937 9.56,34.544
  Mid Layer 2 w0.229: v3(24.359,14.173) v3(25.552,15.367)
  Mid Layer 2 w0.254: v3(5.334,8.839) 5.334,14.978 v1(5.799,15.443) 6.274,15.443 v1(7.188,16.358)
  Bottom Layer w0.125: U11.D1@13.221,38.246 13.545,38.246 13.929,38.631 15.224,38.631 15.482,38.373 15.991,38.373 16.494,37.87 L13.2@16.494,37.523
  Bottom Layer w0.152: U11.D1@13.199,38.23 U11.D1@13.22,38.247 ; U12.14@17.583,12.671 17.847,12.671 18.308,13.132 C55.1@18.308,13.259
  Bottom Layer w0.229: U13.4@7.654,20.559 7.688,20.593 C7.1@9.017,20.593 10.941,20.593 10.956,20.608 ; U14.2@16.713,16.199 16.713,16.911 C58.1@16.719,16.916 16.719,16.95 18.279,16.95 18.333,16.95 18.349,16.966 ; 18.35,16.891 21.92,16.891 24.359,14.453 v3(24.359,14.173) ; v3(25.552,15.367) 34.95,15.367 35.752,14.565 C8.2@35.752,13.791
  Bottom Layer w0.254: 11.341,25.527 R23.1@12.923,25.527 ; 11.976,26.162 R22.1@12.923,26.162 ; C55.1@18.279,13.301 18.279,16.95 18.279,17.056 ; C8.2@35.752,13.791 35.758,13.786 U5.5@35.758,13.051
  Bottom Layer w0.381: v1(7.188,16.358) 7.29,16.358 8.727,17.795 8.727,18.353 10.969,20.595 ; P2.2@9.119,31.496 10.643,33.02 15.113,33.02 15.519,33.426 15.519,35.224 C46.2@16.251,35.956 ; 11.031,20.533 12.864,18.7 16.86,18.7 18.349,17.211 18.349,16.966 ; v1(18.999,36.906) 18.999,45.72 v1(20.549,47.269)
  Bottom Layer w0.508: 10.969,20.595 10.956,20.608 10.956,25.142 11.341,25.527 11.976,26.162 13.97,28.156 13.97,30.251 P4.2@15.215,31.496 16.429,32.711 C46.2@16.429,35.835 ; C46.2@16.256,36.065 16.256,35.95 C46.2@16.374,36.068
3V3: C45.2 C48.2 P5.2 ST1.1 ST2.1 ST3.1 ST4.1 ST5.1 TP19.1 U11.A3 | length 38.1
  Top Layer w0.508: v1(23.774,48.006) 24.994,48.006 TP19.1@25,48
  Bottom Layer w0.152: U11.A3@12.421,39.463 12.428,39.45 U11.A3@12.43,39.446
  Bottom Layer w0.3: C48.2@12.13,40.427 12.13,39.959 12.421,39.668 U11.A3@12.421,39.5
  Bottom Layer w0.508: C48.2@12.13,40.605 12.13,41.314 14.58,43.764 17.145,43.764 ; C45.2@17.475,26.264 17.475,26.594 16.51,27.559 16.51,30.251 P5.2@17.755,31.496 18.103,31.844 18.103,35.206 18.415,35.518 18.415,42.494 17.145,43.764 ; v1(23.774,48.006) 18.847,48.006 17.145,46.304 17.145,43.764
4FF_1V8: C54.1 D3.A4 J4.C1 U16.1 | length 8.2
  Mid Layer 2 w0.2: v1@21.394,39.268 v1@21.407,39.281 ; v1(21.42,39.268) 21.42,39.145 21.751,38.813 22.278,38.813 23.368,39.903 v3(23.368,40.361) ; v3(22.317,37.557) 22.622,37.557 23.368,38.303 v3(23.368,39.167)
  Bottom Layer w0.2: v3(22.317,37.557) U16.1@22.317,36.996 U16.1@22.327,36.986 ; v3(23.368,39.167) v3(23.368,40.361) 23.368,40.751 D3.A4@23.828,41.211
4FF_CLK: D3.A2 U16.9 | length 3.4
  Bottom Layer w0.152: U16.9@21.117,38.646 21.117,38.999 21.018,39.097 21.018,39.406 D3.A2@22.828,41.216
4FF_IO: D3.A3 U16.13 | length 3
  Bottom Layer w0.152: U16.13@22.942,38.421 22.942,40.83 D3.A3@23.328,41.216
4FF_RST: D3.A1 U16.5 | length 6.1
  Bottom Layer w0.152: U16.5@20.492,37.221 20.147,37.221 20.091,37.165 19.758,37.165 19.537,37.385 19.537,38.425 D3.A1@22.328,41.216
AGND: C52.1 R26.2 R35.1 R36.2 R37.2 ST11.1 U11.B2 U11.F4 | length 3.2
  Bottom Layer w0.125: R37.2@9.249,42.369 v6(9.249,42.739) ; R36.2@9.858,42.369 v6(9.858,42.739) ; R35.1@11.687,42.369 v6(11.687,42.739)
  Bottom Layer w0.203: U11.F4@12.021,37.446 12.021,36.781 C52.1@12.201,36.601 ; 12.144,36.033 12.799,35.378 R26.2@12.799,35.144
  other v3: 11.916,36.084
  other v6: 12.821,39.046
ANT_GPS: C5.1 C13.2 L3.1 | length 1.6
  Top Layer w0.146: L3.1@35.395,4.612 C5.1@35.395,6.215
ANT_LTE: A1.1 C15.1 L8.1 U3.13 | length 8
  Top Layer w0.146: v1(37.77,0.991) 39.385,0.991 cw(c39.385,0.904) 39.446,0.965
  Bottom Layer w0.146: U3.13@32.671,2.936 32.671,2.736 ccw(c34.417,2.736) 34.417,0.991 v1(37.77,0.991)
BLE_ANT: A2.1 C35.1 R11.2 | length 1.2
  Top Layer w0.146: R11.2@24.697,3.175 A2.1@25.873,3.175
BLE_RF: F1.1 L10.2 | length 1.5
  Top Layer w0.146: L10.2@22.132,5.976 22.723,5.976 cw(c22.723,5.425) F1.1@23.275,5.425
BSNS: ST10.1 U11.C6 | length 5.7
  Bottom Layer w0.125: ST10.1@6.147,39.751 6.248,39.751 6.484,39.515 7.283,39.515 7.506,39.739 10.04,39.739 11.133,38.646 U11.C6@11.221,38.646
CLK: D3.C2 J4.C3 | length 2.7
  Bottom Layer w0.203: v1(21.394,44.148) 22.828,42.715 D3.C2@22.828,42.091
COEX0: SB12.1 TP39.1 U1.93 U6.G1 | length 34
  Top Layer w0.125: v1(13.906,20.944) 14.488,20.944 14.956,21.412 U1.93@14.956,21.597 ; U6.G1@19.897,6.676 19.961,6.676 20.685,7.4 20.685,7.81 21.388,8.514 v1(21.388,8.691)
  Mid Layer 2 w0.125: v1(13.906,20.944) 14.493,20.944 15.206,20.231 15.206,18.275 16.336,17.145 18.551,17.145 21.983,13.712 21.983,10.989 21.205,10.211 21.205,8.874 v1(21.388,8.691)
  Bottom Layer w0.125: TP39.1@13.2,21.1 13.313,20.987 13.863,20.987 v1(13.906,20.944) ; v3(21.819,13.691) 25.014,13.691 25.928,14.605 32.057,14.605 SB12.1@32.662,14
D_N: J6.2 TP30.1 U6.J8 | length 35.9
  Top Layer w0.165: TP30.1@3,23.8 3.2,24 v1(3.2,24.65)
  Mid Layer 1 w0.165: v1(16.493,9.301) 16.607,9.301 16.951,8.957 16.951,8.167 17.092,8.026 17.447,7.671 v5(17.447,7.376)
  Bottom Layer w0.165: J6.2@4.125,24.65 v1(3.2,24.65) 3.05,24.65 2.847,24.447 2.847,20.73 2.085,19.968 2.085,15.439 3.734,13.791 3.734,8.025 4.339,7.419 12.646,7.419 14.043,8.816 15.6,8.816 16.004,9.22 16.413,9.22 v1(16.493,9.301)
D_P: J6.3 TP31.1 U6.K8 | length 36.7
  Top Layer w0.165: TP31.1@3,26.55 3.194,26.356 v1(3.194,25.3) ; v1(16.493,8.767) 16.639,8.767 17.447,7.959 U6.K8@17.447,7.726
  Bottom Layer w0.165: J6.3@4.125,25.3 v1(3.194,25.3) 2.489,24.596 2.489,20.879 1.727,20.117 1.727,15.291 3.376,13.642 3.376,7.877 4.191,7.061 12.795,7.061 14.192,8.458 15.748,8.458 16.082,8.793 v1@16.493,8.793
DATA: D3.C3 J4.C7 | length 3
  Bottom Layer w0.203: D3.C3@23.328,42.091 23.328,43.496 24.081,44.248 v1(24.564,44.248)
DEC0: C64.1 D1.2 U1.13 | length 5.1
  Top Layer w0.254: v1(8.306,14.554) 8.306,15.481 8.352,15.527 9.256,15.527 9.306,15.477 U1.13@9.834,15.477
  Bottom Layer w0.254: v1(8.306,14.554) 8.306,15.787 9.204,16.686 9.204,16.737 9.206,16.739 D1.2@9.257,16.739
DEC1: C21.1 U6.A10 | length 1.1
  Top Layer w0.2: C21.1@15.915,4.017 16.273,4.017 16.747,4.492 U6.A10@16.747,4.576
DEC4_6: C28.2 C29.1 L12.1 U6.A8 U6.C2 | length 11
  Top Layer w0.2: U6.A8@17.447,4.576 17.447,3.94 17.693,3.694 18.671,3.694 19.067,3.298 19.069,3.298 19.283,3.083 19.283,3.011 19.318,2.976 19.318,1.534 18.805,1.02 L12.1@17.699,1.02 ; v5(20.532,4.957) v5(21.319,4.17)
  Mid Layer 1 w0.15: v5(19.547,5.272) 20.217,5.272 v5(20.532,4.957)
  Mid Layer 1 w0.2: v5(19.074,3.306) 19.445,3.677 20.826,3.677 v5@21.269,4.119
DETECT: R38.2 R49.1 R52.1 U16.2 | length 9.1
  Mid Layer 2 w0.152: v3(21.917,36.428) 21.947,36.398 24.098,36.398 v3(24.5,36.8)
  Bottom Layer w0.152: R52.1@23.995,36.345 24.054,36.404 24.104,36.404 v3(24.5,36.8) 25.248,37.548 R38.2@25.248,41.019
  Bottom Layer w0.2: U16.2@21.917,36.996 v3(21.917,36.428) 21.917,35.862 R49.1@21.94,35.839
EN1: R30.2 U11.E2 | length 4.3
  Mid Layer 2 w0.125: v6(12.252,34.458) 12.397,34.458 13.564,35.625 13.564,37.103 v6(12.821,37.846)
EN2: R32.2 U11.B4 | length 3.4
  Mid Layer 2 w0.125: v6(10.468,41.799) 10.66,41.606 10.66,40.53 12.023,39.167 v6@12.023,39.02
  other v6: 12.021,39.046
ENABLE: R7.2 U1.101 | length 1.1
  Top Layer w0.203: U1.101@10.906,21.519 U1.101@10.984,21.597 ; U1.101@10.956,21.597 10.995,21.638 10.995,22 11.287,22.292 11.287,22.439 R7.2@11.321,22.472
ENCHG: R29.2 U11.F3 | length 2.5
  Mid Layer 2 w0.125: v6(12.252,35.144) 12.252,35.442 12.533,35.723 12.533,37.131 v6(12.421,37.243)
  Bottom Layer w0.152: v6(12.421,37.243) U11.F3@12.421,37.446
ENSD: R33.1 R35.2 U11.B3 | length 4.1
  Mid Layer 2 w0.125: v6(11.078,41.799) 10.91,41.632 10.91,40.633 12.421,39.123 v6(12.421,39.046)
  Bottom Layer w0.125: v6(11.078,41.799) R35.2@11.687,41.799

## Text inside footprints (layer, text, board x,y; h text height)
J4: Top Placement "NO VIA / NO TRACE" at 29.462,43.51 h0.55 r270; Top Placement "NO VIA / NO TRACE" at 26.16,44.272 h0.55 r270
LD1: Bottom Overlay "+" at 38.625,25.875 h0.6
P8: Bottom Overlay "1" at 4.74,7.3 h1.02 r270